# Altium PCB PogopenPCB_v2.PcbDoc
Units mm, origin at the board's own origin, x right, y up, seen from the top; angles counter-clockwise.
Board outline 24.35 x 17.9 mm, 2 copper layers (Top Layer, Bottom Layer); 10 components, 8 nets, 33 pads, 5 vias.
Unrouted connection lines stored in the file: 2.
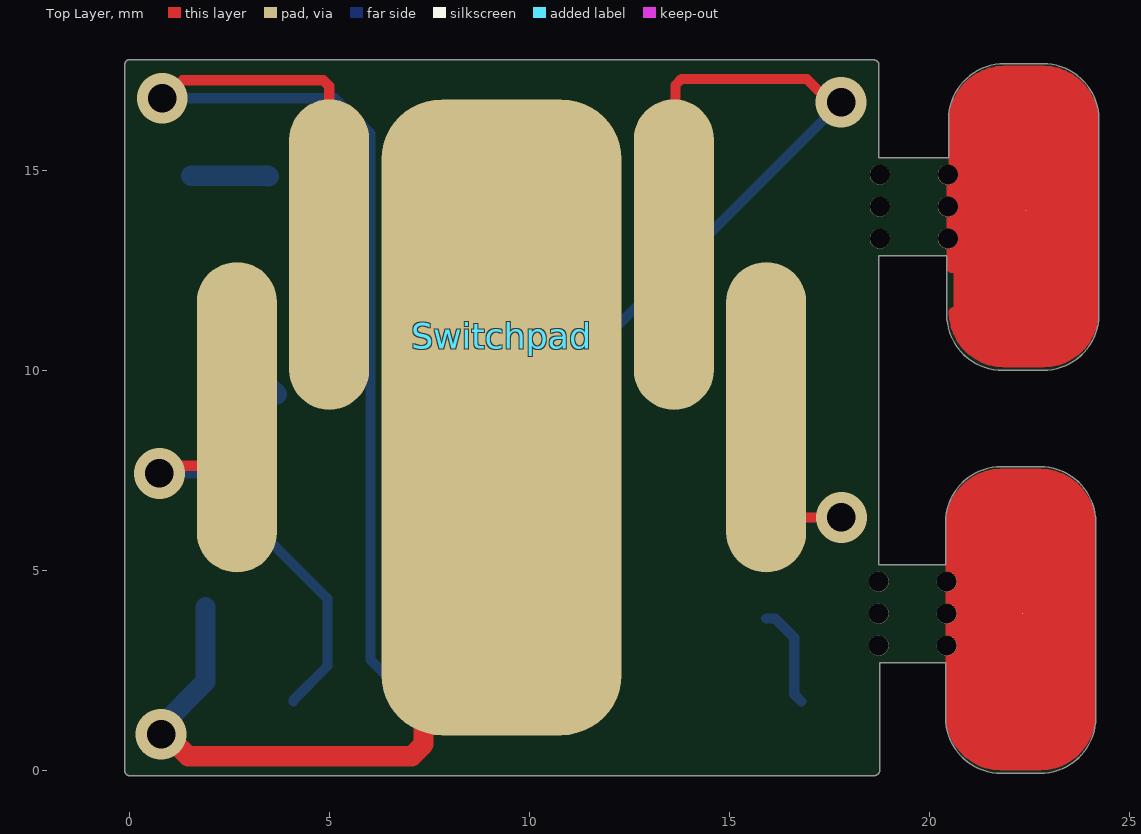
[diagram p0: Top Layer view]
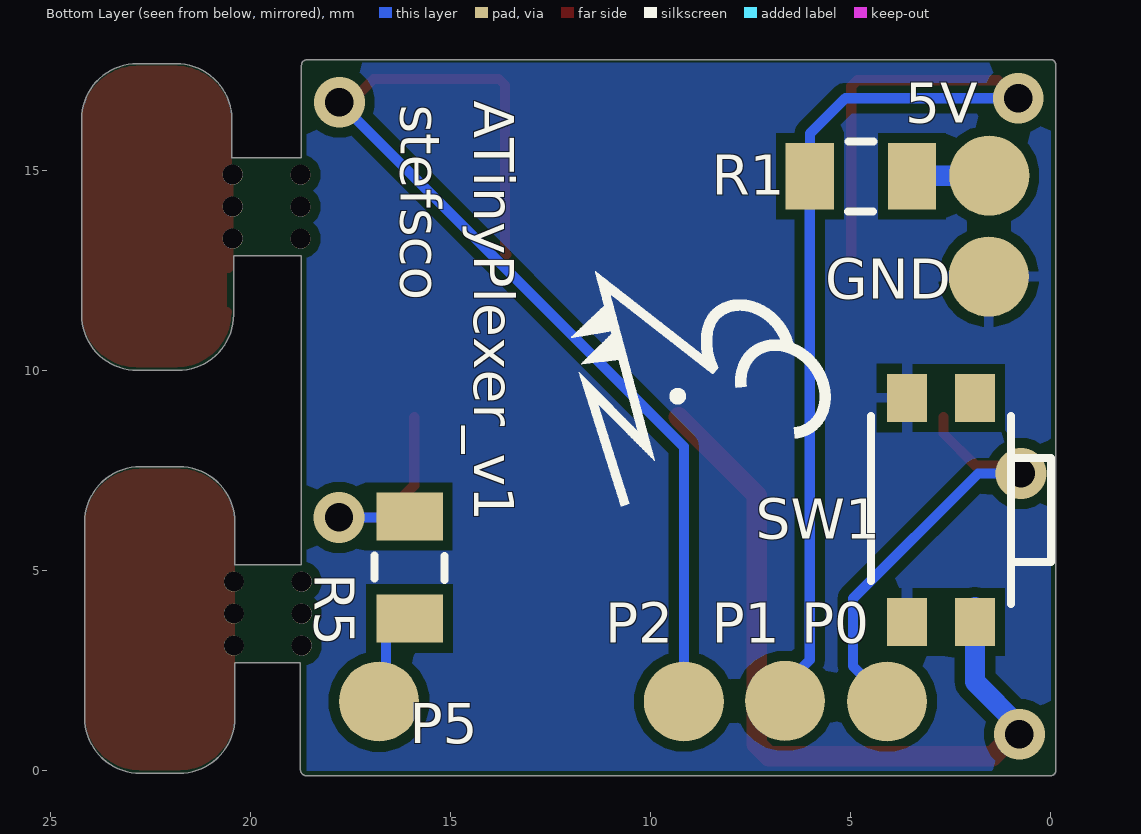
[diagram p1: Bottom Layer view, seen from below]
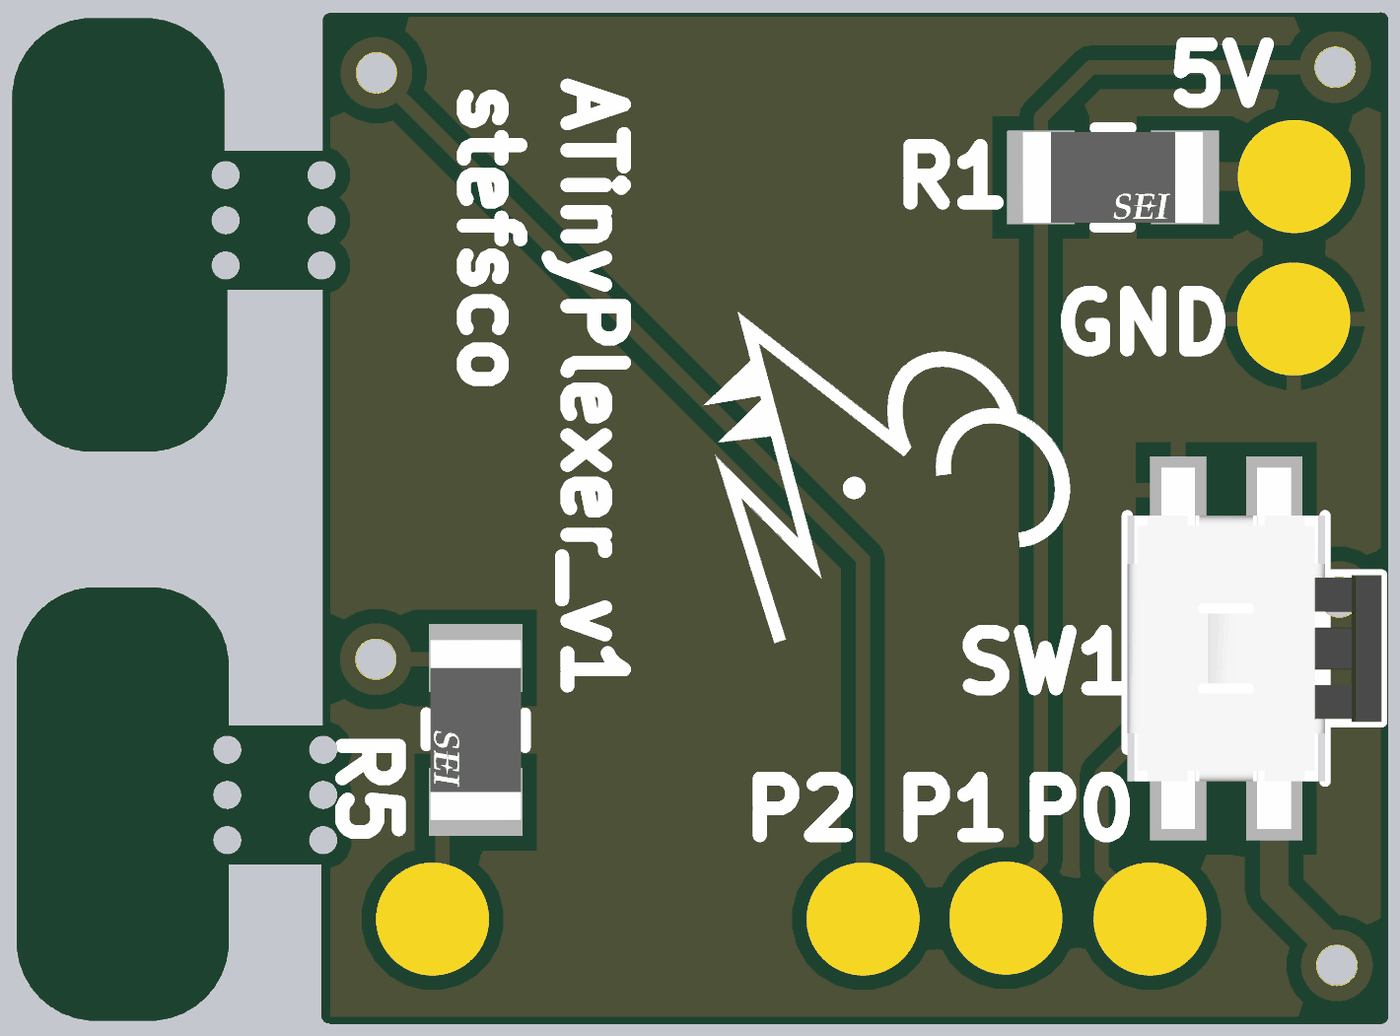
[diagram p2: 3D render of the assembled board from below, using the file's embedded part models]

## Layer stack, top to bottom
Top Solder: solder mask 0.0102, Solder Resist, Dk 3.5
Top Layer: signal copper 0.0356
Dielectric 1: dielectric 0.32, FR-4, Dk 4.8
Bottom Layer: signal copper 0.0356
Bottom Solder: solder mask 0.0102, Solder Resist, Dk 3.5

## Board outline
-0.127,0 ccw(c0,0) 0,-0.127 18.6,-0.127 ccw(c18.6,0.026) 18.754,0.026 18.754,2.699 20.395,2.699 20.395,1.328 ccw(c21.792,1.328) 21.792,-0.069 22.75,-0.069 ccw(c22.75,1.328) 24.147,1.328 24.147,6.205 ccw(c22.75,6.205) 22.75,7.603 21.792,7.603 ccw(c21.792,6.205) 20.395,6.205 20.395,5.154 18.727,5.154 18.727,12.873 20.424,12.873 20.424,11.402 ccw(c21.821,11.402) 21.821,10.005 22.828,10.005 ccw(c22.828,11.402) 24.225,11.402 24.225,16.279 ccw(c22.828,16.279) 22.828,17.676 21.868,17.676 ccw(c21.868,16.279) 20.471,16.279 20.471,15.8 20.473,15.778 20.473,15.327 18.727,15.327 18.727,17.641 ccw(c18.6,17.641) 18.6,17.768 0.047,17.768 ccw(c0,17.65) -0.127,17.65

## Design rules (kind name [scope] priority, off if disabled: settings)
Clearance [All] p1: gap=0.254 ignorepadtopadclearanceinfootprint=FALSE
PolygonConnect [All] p1: connectstyle=Relief reliefconductorwidth=0.254 reliefentries=4 polygonreliefangle="90 Angle" airgapwidth=0.254
RoutingVias [All] p1: holewidth=0.711 width=1.27 viastyle="Through Hole" minholewidth=0.711 minwidth=1.27 maxholewidth=0.711 maxwidth=1.27
SolderMaskExpansion [All] p1: expansion=0 istentingtop=FALSE
SupplyNets "Schematic Supply Nets" [InNet('GND')] p1: voltage=0.000
Width [All] p1: maxlimit=0.508 minlimit=0.254 preferedwidth=0.254
30 further rules are at their usual default settings.

## Components (designator, comment, footprint, x,y, rotation, side; value= is the part's Value field where it differs from the comment)
5V "" Pogopin_pad_female_2mm 3.692,18.558 r90 bottom
GND "" Pogopin_pad_female_2mm 3.705,16.034 r90 bottom
P0 "" Pogopin_pad_female_2mm 0.405,3.889 r180 bottom
P1 "" Pogopin_pad_female_2mm 2.958,3.906 r180 bottom
P2 "" Pogopin_pad_female_2mm 5.485,3.889 r180 bottom
P5 "" Pogopin_pad_female_2mm 13.105,3.889 r180 bottom
R1 "1K" FP-RMCF1206-IPC_C 4.744,14.86 r180 bottom
R5 "220k" FP-RMCF1206-IPC_C 16.024,5.076 r270 bottom
SW1 "434331045822" 434331045822 2.74,6.52 r90 bottom (schematic designator SW?)
Switchpad "DigiSparkSwitcher" DigiSparkSwitcher 9.293,8.835 r0 top

## Footprints (in the part's own frame and the unit in brackets; to place one, negate y for a bottom-side part, rotate by r counter-clockwise, add the part's x,y. Pads: shape width x height; smd on the part's side, far side on the other; paste and mask are expansions set on the pad)
434331045822 [mm] "3.5x4.7 mm SMD side push"
  rect 1.2x1 smd: A1(-2.8,0.85) A2(2.8,0.85) B1(-2.8,-0.85) B2(2.8,-0.85)
  silkscreen extent -2.35,-2.75 2.35,1.75, body extent -3.2,-2.75 3.2,1.75, height 1.65
DigiSparkSwitcher [mm]
  oval 2x7.765 smd paste-2539.97 mask+0: 1(-4.308,4.067) 2(-6.617,0) 3(4.308,4.067) 4(6.617,0)
  rrect50% 6x15.9 smd paste-2539.97 mask+0: 5(0,0)
FP-RMCF1206-IPC_C [mm]
  rect 1.204x1.658 smd paste+0 mask+0: 1(-1.276,0) 2(1.276,0)
  silkscreen extent -0.32,-0.87 0.32,0.87, body extent -1.6,-0.8 1.6,0.8, height 0.7
Pogopin_pad_female_2mm [mm]
  round 2 smd paste-2539.97: 1(-3.683,-2.159)

## Part data
5V GND P0 P1 P2 P5: library part PogoPinPad, "Simple pad for the pogo pin to make contact with"
R1 R5: library part CMP-26527-000314-1, "1206", Max Operating Temperature=155°C, Max Power Dissipation=250mW, Min Operating Temperature=-55°C, Resistance=3.9MR, Resistor Type="Thick Film", Temperature Coefficient=200ppm/°C, Tolerance=5%, Case/Package=1206, Contact Plating=Tin, Features="Automotive AEC-Q200", Height=0.028inch, Length=0.126inch, Mount="Surface Mount", Number of Terminations=2, Packaging="Tape and Reel", Radiation Hardening=No, RoHS Compliant=Yes, Series=RMCF, Width=0.063inch
SW1: library part CMP-1461-00001-3, "Switch Tactile Spst-no 0.05A 12V", Contact Current Rating=50mA, Contact Resistance=100mΩ, Insulation Resistance=100MΩ, Max Operating Temperature=85°C, Min Operating Temperature=-40°C, Operating Force=2.16N, Voltage Rating=12V, Contact Plating=Silver, Current Rating=50mA, Height=1.65mm, Packaging="Tape and Reel", RoHS=Compliant, Width=4.7mm

## Free pads (board coordinates)
  round 0.025 smd: 6(22.32,3.926) 7(22.398,14)
  round 0.5 hole 0.5 unplated: 10(18.722,3.126) 10(18.722,3.926) 10(18.722,4.726) 10(18.751,13.3) 10(18.751,14.1) 10(18.751,14.9) 10(20.42,3.126) 10(20.42,3.926) 10(20.42,4.726) 10(20.449,13.3) 10(20.449,14.1) 10(20.449,14.9)

## Via types
v1: diameter 1.27, hole 0.711, Top Layer to Bottom Layer, tented top, 5 vias

## Nets (pads, with @x,y where several pads share a name; then routed paths per layer and width w, separated by ;. In a path a pad name is that pad's centre, name@x,y a point inside that pad or via, vN(x,y) a via of type N, cw(c..) or ccw(c..) an arc to the next point about the centre after c; other vN are vias at no path point)
5V: 5V.1 R1.2 | length 1.9
  Bottom Layer w0.508: 5V.1 3.454,14.875 R1.2
GND: GND.1 SW1.A1 SW1.A2 | length 0.2
  Bottom Layer w0.508: SW1.A2@3.512,9.575 SW1.A2@3.68,9.407
NetR5_1: R5.1 Switchpad.4 | length 5.7
  Top Layer w0.254: Switchpad.4@15.91,8.84 15.91,7.137 16.717,6.33 v1(17.79,6.33)
  Bottom Layer w0.254: R5.1 16.045,6.33 v1(17.79,6.33)
NetSW1_B1: SW1.B1 SW1.B2 Switchpad.5 | length 19.5
  Top Layer w0.508: v1(0.78,0.91) 0.909,0.91 1.459,0.36 7.045,0.36 7.342,0.658 7.342,6.889 Switchpad.5@9.293,8.84
  Bottom Layer w0.508: v1(0.78,0.91) 0.78,1.116 1.89,2.226 SW1.B1@1.89,4.085
P0: P0.1 Switchpad.2 | length 11.2
  Top Layer w0.254: v1(0.74,7.43) 0.934,7.624 1.869,7.624 2.676,8.431 Switchpad.2
  Bottom Layer w0.254: v1(0.74,7.43) 1.81,7.43 4.944,4.296 4.944,2.618 4.088,1.762 P0.1
P1: P1.1 R1.1 Switchpad.1 | length 28.6
  Top Layer w0.254: v1(0.81,16.81) 0.87,16.81 1.32,17.26 4.836,17.26 4.985,17.111 Switchpad.1@4.985,12.907
  Bottom Layer w0.254: v1(0.81,16.81) 5.13,16.81 6.019,15.921 6.019,14.861 R1.1 6.02,2.769 6.641,2.148 P1.1
P2: P2.1 Switchpad.3 | length 27.2
  Top Layer w0.254: Switchpad.3@13.601,12.907 13.64,12.946 13.64,17.141 13.789,17.29 16.925,17.29 17.505,16.71 v1(17.78,16.71)
  Bottom Layer w0.254: P2.1 9.168,8.098 v1(17.78,16.71)
P5: P5.1 R5.2 | length 2.6
  Bottom Layer w0.254: R5.2@15.91,3.8 16.137,3.8 16.612,3.325 16.612,1.906 P5.1
copper on no net: | length 38.8
  Top Layer w0.254: 20.549,12.57 20.549,14.7 ; 20.598,11.47 ccw(c21.868,11.47) 21.868,10.2 22.828,10.2 ccw(c22.828,11.47) 24.098,11.47 24.098,16.23 ccw(c22.828,16.23) 22.828,17.5 21.868,17.5 ccw(c21.868,16.23) 20.598,16.23 20.598,13.6 ; 20.52,1.396 ccw(c21.79,1.396) 21.79,0.126 22.75,0.126 ccw(c22.75,1.396) 24.02,1.396 24.02,6.156 ccw(c22.75,6.156) 22.75,7.426 21.79,7.426 ccw(c21.79,6.156) 20.52,6.156 20.52,3.526 20.52,1.396

## Polygon pours and split planes (outlines as drawn)
GND on Bottom Layer "GND_L02_P000" (solid, pour order 0): 0,17.6 0.1,17.7 18.6,17.7 18.6,0 0,0

## Other copper
Top Layer:
  region: 21.79,7.426 ccw(c21.79,6.156) 20.52,6.156 20.52,1.396 ccw(c21.79,1.396) 21.79,0.126 22.75,0.126 ccw(c22.75,1.396) 24.02,1.396 24.02,6.156 ccw(c22.75,6.156) 22.75,7.426
  region: 21.868,17.5 ccw(c21.868,16.23) 20.598,16.23 20.598,11.47 ccw(c21.868,11.47) 21.868,10.2 22.828,10.2 ccw(c22.828,11.47) 24.098,11.47 24.098,16.23 ccw(c22.828,16.23) 22.828,17.5

## Silkscreen, mask and mechanical layers (free items; w line width, h text height)
Bottom Overlay:
  drawing of 3 lines, arcs and shapes, not listed
  text "ATinyPlexer_v1" at 14.413,16.746 h1 r90
  text "stefsco" at 16.246,16.646 h1 r90
Mechanical 1:
  lines w0.254: 0,17.641 5.2,17.641 7.4,17.641 11.3,17.641 13.5,17.641 18.6,17.641 18.6,15.2 20.6,15.2 20.6,15.798 ccw(c20.598,15.798) 20.598,15.8 20.598,16.279 cw(c21.868,16.279) 21.868,17.549 22.349,17.549 22.828,17.549 ; 0,17.65 0,0 18.6,0 ccw(c18.6,0.026) 18.626,0.026 18.626,2.826 20.52,2.826 cw(c20.52,2.824) 20.522,2.824 20.522,1.328 ccw(c21.792,1.328) 21.792,0.058 22.75,0.058 ccw(c22.75,1.328) 24.02,1.328 24.02,1.807 24.02,6.205 ccw(c22.75,6.205) 22.75,7.475 21.792,7.475 ccw(c21.792,6.205) 20.522,6.205 20.522,5.026 18.626,5.026 ccw(c18.626,5) 18.6,5 ; 18.6,5.026 18.6,13 20.551,13 20.551,12.981 20.551,11.402 ccw(c21.821,11.402) 21.821,10.132 ; 20.6,15.8 20.6,16.279 cw(c21.87,16.279) 21.87,17.549 22.828,17.549 ; 18.6,5 ccw(c18.6,5) 18.6,5 ; 22.828,10.132 ccw(c22.828,11.402) 24.098,11.402 ; 22.828,10.132 ccw(c22.828,11.402) 24.098,11.402 ; 22.828,10.132 21.87,10.132 22.349,10.132 22.828,10.132 ; 22.828,17.549 cw(c22.828,16.279) 24.098,16.279 ; 22.828,17.549 cw(c22.828,16.279) 24.098,16.279 ; 24.098,11.402 24.098,11.881 ; 24.098,11.402 24.098,11.881 ; 24.098,11.881 24.098,16.279 ; 24.098,11.881 24.098,16.279
Mechanical 15:
  text "Use Hard Gold as the top pad material for best longevity of the sliding components." at -0.4,-9.5 h1